# Altium PCB Mega2560_Custom.PcbDoc (part 4 of 5)
Units mil, origin at the board's own origin, x right, y up, seen from the top; angles counter-clockwise.
Board outline 4724.41 x 2992.13 mil, 2 copper layers (Top Layer, Bottom Layer), stack 57 mil thick; 197 components, 130 nets, 758 pads, 836 vias.
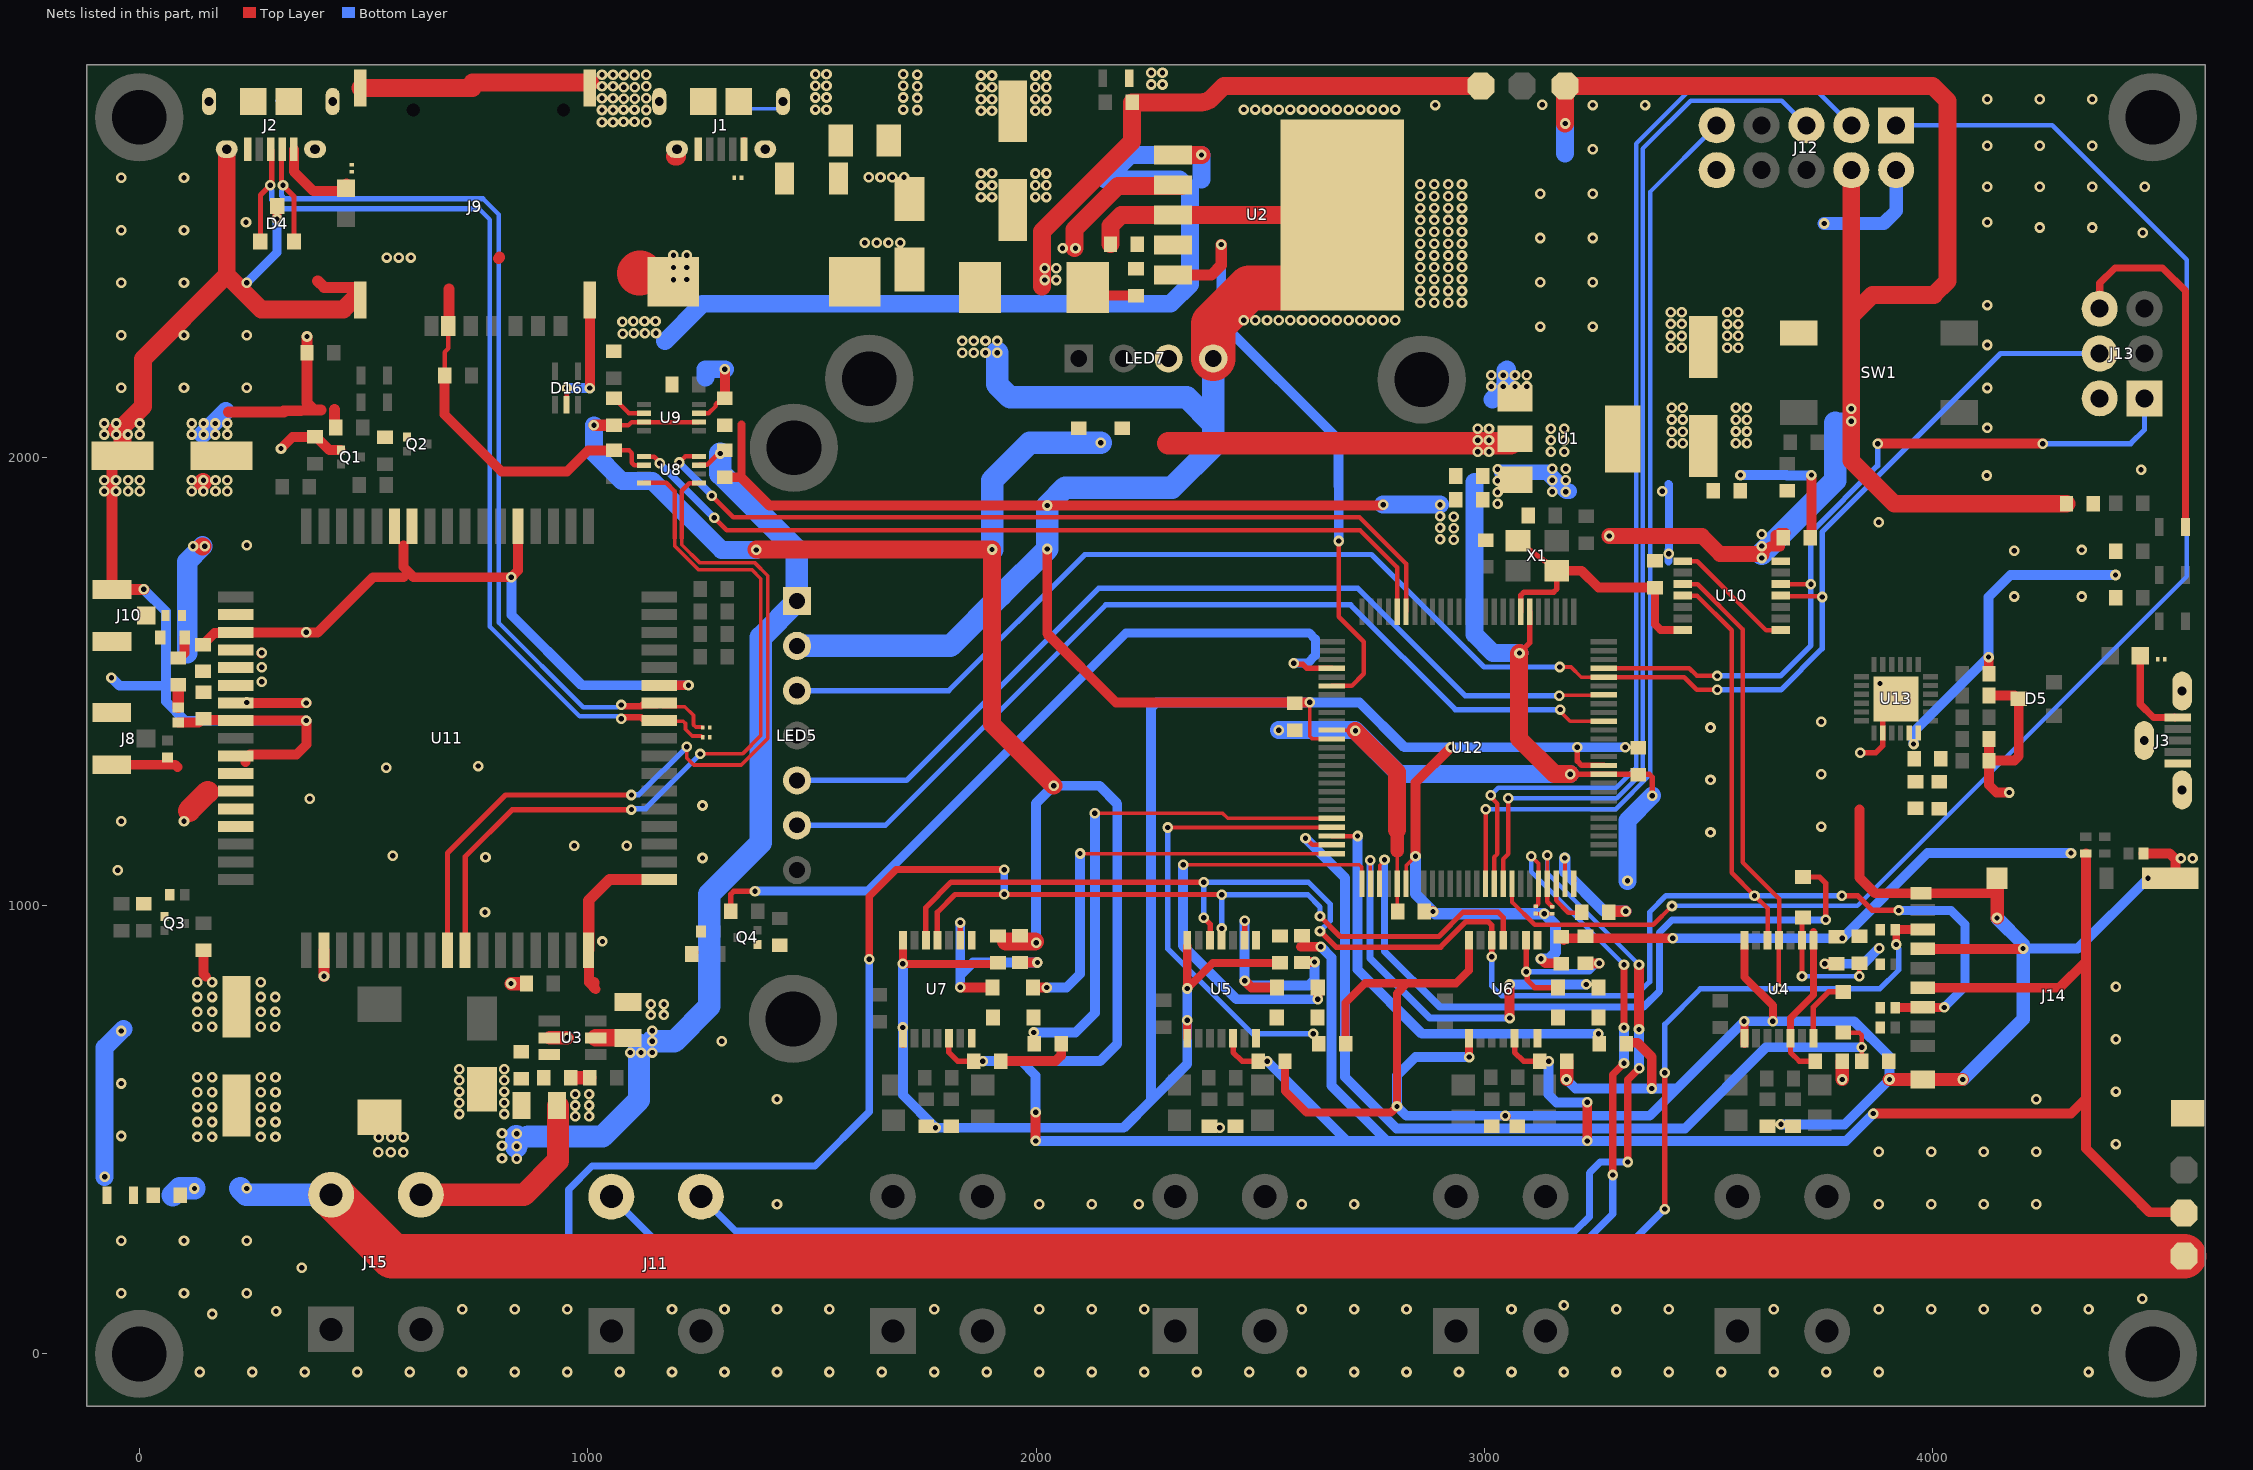
[diagram p2: the nets of this part, all layers, seen from the top]

## Via types
v1: diameter 23.62, hole 11.81, Top Layer to Bottom Layer, 836 vias

## Nets (pads, with @x,y where several pads share a name; then routed paths per layer and width w, separated by ;. In a path a pad name is that pad's centre, name@x,y a point inside that pad or via, vN(x,y) a via of type N, cw(c..) or ccw(c..) an arc to the next point about the centre after c; other vN are vias at no path point) (continued)
GND: (continued)
  other v1: 135.05,-40.23 252.05,-40.23 369.05,-40.23 486.05,-40.23 603.05,-40.23 720.05,-40.23 837.05,-40.23 954.05,-40.23 1071.05,-40.23 1188.05,-40.23 1305.05,-40.23 1422.05,-40.23 1539.05,-40.23 1656.05,-40.23 1773.05,-40.23 1890.05,-40.23 2007.05,-40.23 2124.05,-40.23 2241.05,-40.23 2358.05,-40.23 2475.05,-40.23 2592.05,-40.23 2709.05,-40.23 2826.05,-40.23 2943.05,-40.23 3060.05,-40.23 3177.05,-40.23 3294.05,-40.23 3411.05,-40.23 3528.05,-40.23 3645.05,-40.23 3762.05,-40.23 3879.05,-40.23 4347.05,-40.23 163,89 305,95 720.05,99.77 837.05,99.77 954.05,99.77 1188.05,99.77 1305.05,99.77 1422.05,99.77 1539.05,99.77 1773.05,99.77 2007.05,99.77 2124.05,99.77 2241.05,99.77 2592.05,99.77 2709.05,99.77 2826.05,99.77 3060.05,99.77 3294.05,99.77 3411.05,99.77 3645.05,99.77 3879.05,99.77 3996.05,99.77 4113.05,99.77 4230.05,99.77 4347.05,99.77 3177.05,108.77 4467,123 -40.23,135.05 99.77,135.05 239.77,135.05 362,192 -40.23,252.05 99.77,252.05 239.77,252.05 1422.05,333.77 2007.05,333.77 2124.05,333.77 2229.05,333.77 2592.05,333.77 2709.05,333.77 3879.05,333.77 3996.05,333.77 4113.05,333.77 4230.05,333.77 3879.05,450.77 3996.05,450.77 4113.05,450.77 4230.05,450.77 4408,468 -40.23,486.05 2409.82,504.45 972,530 1003,530 972,554 1003,554 1422.05,567.77 4230.05,567.77 972,579 1003,579 4408,585 -40.23,603.05 1299,697 4408,702 129.35,729.42 162.35,729.42 270.82,729.42 303.35,729.42 1141,756 1170,756 129.35,762.67 162.35,762.67 270.82,762.67 303.35,762.67 1141,780 1170,780 129.35,795.92 162.35,795.92 270.82,795.92 303.35,795.92 4408,819 129.35,829.17 162.35,829.17 270.82,829.17 412,842 1032.82,919.95 771,985 -47.81,1078.64 4553,1105 4579,1105 1256,1106 772.02,1107.88 565,1111 970,1133 1087,1133 3504,1163 3751,1176 -40.23,1188.05 99.77,1188.05 1256,1223 380,1238 3504,1280 3751,1293 551,1307 756,1311 3504,1397 3751,1410 239.77,1452.72 3882,1495 4181,1689 4332,1689 4181,1791 4332,1793 239.77,1803.72 2931,1815.67 2900.82,1816.95 2931,1841.33 2900.82,1842.62 3879.05,1854.77 2931,1867 2900.82,1868.28 -78,1924 -52,1924 -25,1924 1,1924 -78,1948.6 -52,1948.6 -25,1948.6 1,1948.6 4120,1959 3729,1959.95 4464.05,1971.77 3560.58,2030.82 3585.18,2030.82 -78,2050.4 -51.67,2050.4 -25.33,2050.4 1,2050.4 3560.58,2057.15 3585.18,2057.15 4121,2065 -78,2075 -51.67,2075 1,2075 3560.58,2083.48 3585.18,2083.48 3560.58,2109.82 3585.18,2109.82 4121,2154 -40.23,2154.72 99.77,2154.72 239.77,2154.72 3015.18,2157.58 3041.52,2157.58 3067.85,2157.58 3094.18,2157.58 3015.18,2182.18 3041.52,2182.18 3067.85,2182.18 3094.18,2182.18 1835,2233 1861,2233 1887,2233 3415,2244 3439.6,2244 3541.4,2244 3566,2244 4121,2250 1835,2259 1861,2259 1887,2259 1913,2259 3415,2270 3439.6,2270 3541.4,2270.33 3566,2270.33 -40.23,2271.72 99.77,2271.72 239.77,2271.72 3124,2291 3241,2291 3415,2297 3439.6,2297 3541.4,2296.67 3566,2296.67 2462.82,2304.95 2488.82,2304.95 2514.82,2304.95 2540.82,2304.95 2566.82,2304.95 2592.82,2304.95 2618.82,2304.95 2644.82,2304.95 2670.82,2304.95 2696.82,2304.95 2722.82,2304.95 2748.82,2304.95 2774.82,2304.95 2800.82,2304.95 3415,2323 3439.6,2323 3541.4,2323 3566,2323 4121,2339 2856.82,2343.95 2887.82,2343.95 2918.82,2343.95 2949.82,2343.95 2856.82,2370.37 2887.82,2370.37 2918.82,2370.37 2949.82,2370.37 -40.23,2388.72 99.77,2388.72 3124,2389.8 3241,2389.8 2856.82,2396.78 2887.82,2396.78 2918.82,2396.78 2949.82,2396.78 2856.82,2423.2 2887.82,2423.2 2918.82,2423.2 2949.82,2423.2 2856.82,2449.62 2887.82,2449.62 2918.82,2449.62 2949.82,2449.62 2856.82,2476.04 2887.82,2476.04 2918.82,2476.04 2949.82,2476.04 3124,2488.6 3241,2488.6 4468,2500 2856.82,2502.46 2887.82,2502.46 2918.82,2502.46 2949.82,2502.46 -40.23,2505.72 99.77,2505.72 4238,2512 4355,2512 238,2524 4121,2524 2856.82,2528.88 2887.82,2528.88 2918.82,2528.88 2949.82,2528.88 2856.82,2555.29 2887.82,2555.29 2918.82,2555.29 2949.82,2555.29 2856.82,2581.71 2887.82,2581.71 2918.82,2581.71 2949.82,2581.71 3124,2587.4 3241,2587.4 4121,2603 4238,2603 4355,2603 4472,2603 2856.82,2608.13 2887.82,2608.13 2918.82,2608.13 2949.82,2608.13 -40.23,2622.72 99.77,2622.72 1626.53,2624.05 1652.87,2624.05 1679.2,2624.05 1705.53,2624.05 3241,2686.2 4121,2694 4238,2694 4355,2694 1031.82,2746.95 1056.42,2746.95 1130.22,2746.95 1079.82,2747.95 1104.42,2747.95 1877,2772 1901.6,2772 1998.4,2772 2023,2772 1031.82,2773.95 1056.42,2773.95 1130.22,2773.95 1735,2774 1079.82,2774.95 1104.42,2774.95 1507.82,2774.95 1532.42,2774.95 1704,2775 2462.82,2774.95 2488.82,2774.95 2514.82,2774.95 2540.82,2774.95 2566.82,2774.95 2592.82,2774.95 2618.82,2774.95 2644.82,2774.95 2670.82,2774.95 2696.82,2774.95 2722.82,2774.95 2748.82,2774.95 2774.82,2774.95 2800.82,2774.95 2890,2785 3241,2785 3358,2785 3129,2786 1877,2798 1901.6,2798 1998.4,2798.33 2023,2798.33 4121,2798 4238,2798 4355,2798 1080.4,2799 1105,2799 1031.82,2799.95 1056.42,2799.95 1130.22,2799.95 1735,2801 1507.82,2801.95 1532.42,2801.95 1704,2802 1080.4,2825 1105,2825 1877,2825 1901.6,2825 1998.4,2824.67 2023,2824.67 1031.82,2826.95 1056.42,2826.95 1130.22,2826.95 1735,2827 1507.82,2827.95 1532.42,2827.95 1704,2828 2256.82,2830.95 2281.82,2830.95 1877,2851 1901.6,2851 1998.4,2851 2023,2851 1080.4,2852 1105,2852 1031.82,2852.95 1056.42,2852.95 1130.22,2852.95 1735,2853 1507.82,2853.95 1532.42,2853.95 1704,2854 2256.82,2856.95 2281.82,2856.95
GNSS_ANT: C39.2 J10.1 L3.2
GSM_FB: R1.1 R2.1 U2.4
GSM_PWR: C8.1 C36.1 C37.1 C38.1 D21.1 L2.2 P4.1 R1.2 R7.2 R20.2 R25.2 R26.2 U11.55 U11.56 U11.57 | length 2335.2
  Top Layer w22: v1@272.82,1561.95 v1(272.82,1563.95) ; C8.1@2141.82,2359.95 R1.2@2222.82,2359.95
  Top Layer w25: D21.1@87,1441.46 R20.2@87,1492 ; 199,2100.5 322,2100.5 ; 321.95,2103.1 405.14,2104.86 389.64,2104.86 374,2120.5 R25.2@374,2233 v1(374,2269) ; 435.5,2105.5 435.5,2068.5 R26.2@438,2066 ; 800.82,2442.95 803.32,2445.45
  Top Layer w40: v1@140.82,1801.18 v1@141,1801 ; v1@141,1943 v1@142,1944 ; C36.1@194.82,1998.82 C36.1@196.82,1996.82 ; 2012.82,2379.95 2012.82,2502.82 2214,2704 R7.2@2214,2791 2368.42,2791 ccw(c2368.34,2823.97) 2391.63,2800.63 2418.95,2827.95 P4.1@2991.82,2827.95
  Top Layer w100: 1115.26,2409.95 1116.26,2410.95
  Bottom Layer w25: 101.82,1551.95 107.82,1557.95 107.82,1696
  Bottom Layer w40: v1@140.82,2050.95 192.87,2103
  Bottom Layer w45: 107,1562 107,1767 v1@141,1801
  other v1: 272.82,1498.95 272.82,1531.45 120,1801 146,1801 117,1924 143,1924 170,1924 196,1924 117,1948.6 143,1948.6 170,1948.6 196,1948.6 117,2050.4 143.33,2050.4 169.67,2050.4 196,2050.4 117,2075 143.33,2075 169.67,2075 196,2075 1191.18,2395.32 2019,2395 2045,2395 1221,2395.95 2019,2421 2045,2421 1191.18,2422.63 1221,2422.95 551.82,2444.95 578.82,2444.95 605.82,2444.95 1191.18,2449.95 1221,2449.95
GSM_PWR_EN: U2.5 U12.56 | length 1333.7
  Top Layer w10: U12.56@2659.67,1489.59 2703.59,1489.59 2730.82,1516.82 2730.82,1587.95 2674.82,1643.95 v1(2674.82,1812.95)
  Top Layer w25: U2.5@2305.07,2406.09 2390.96,2406.09 2412.82,2427.95 v1(2412.82,2473.95)
  Bottom Layer w22: v1(2412.82,2473.95) 2412.82,2300.18 2674,2039 2674,1935 ; v1(2674.82,1812.95) 2674.82,1935
GSM_RESET: R33.2 U12.54 | length 1764.9
  Top Layer w12: R33.2@1319,992 1319,1024.97 1326.03,1032 v1(1373,1032) ; v1(2574.82,1539.95) 2577.05,1537.72 2595.05,1537.72 2603.81,1528.96 U12.54@2659.67,1528.96
  Bottom Layer w20: v1(1373,1032) 1624.91,1032 2200.86,1607.95 2608.82,1607.95 2622.82,1593.95 2622.82,1558.04 2605.42,1540.64 2575.52,1540.64 v1(2574.82,1539.95)
GSM_RX: U8.4 U11.10 | length 1751.8
  Top Layer w8: 1194.39,1819 1194.39,1801.61 1247.61,1748.39 1366.61,1748.39 1386,1729 1386,1379 1345,1338 v1(1251,1338)
  Top Layer w10: U8.4@1125.8,1942.42 1175.35,1942.42 1194.39,1923.38 1194.39,1819
  Top Layer w12: U11.10@726.63,900.55 726.63,1108.76 831.82,1213.95 v1(1097.45,1213.95) v1@1099.82,1213.95
  Bottom Layer w12: v1(1097.45,1213.95) 1099.68,1216.17 1129.17,1216.17 v1(1251,1338)
GSM_TX: U8.5 U11.9 | length 1833.8
  Top Layer w8: 1210,1819 1210,1804.38 1250.38,1764 1373.08,1764 1401.61,1735.47 1401.61,1372.53 1342.47,1313.39 1236.61,1313.39 1221.11,1328.89 v1(1221.11,1353.98)
  Top Layer w10: 1210,1819 1210,1925.13 1226.39,1941.52 1246.94,1941.52 U8.5@1247.85,1942.42
  Top Layer w12: U11.9@687.26,900.55 687.26,1117.07 816.67,1246.48 v1(1097.45,1246.48)
  Bottom Layer w12: v1(1097.45,1246.48) 1098.11,1247.13 1114.27,1247.13 v1(1221.11,1353.98)
GSM_USB.GSM_USB_D_N: D4.2 D17.1 J2.2 U11.28 | length 2228.2
  Top Layer w8: U11.28@1159.7,1451.73 1167.91,1443.52 1216.48,1443.52 1236,1424 1236,1402.69 1240.69,1398 1252.16,1398 1252.43,1397.72 D17.1@1256.19,1397.72
  Top Layer w12: J2.2@319.04,2686.65 317.25,2684.85 317.25,2614 318.34,2612.91 318.34,2608.22 345,2581.56 D4.2@345,2481
  Top Layer w15: v1(1074.82,1447.35) 1076.47,1445.7 1082.57,1445.7 1083.73,1444.54 1119.05,1444.54 1121.53,1447.02 1155,1447.02 U11.28@1159.7,1451.73
  Bottom Layer w10: 766.58,2576.16 801.74,2541 ; 802,2541 802,1630.06 990.01,1442.04 1065.83,1442.04 1071.14,1447.35 v1(1074.82,1447.35)
  Bottom Layer w12: v1(320.56,2606) 318.34,2603.78 318.34,2595.56 317.25,2594.47 317.25,2583.19 324.28,2576.16 766.58,2576.16
GSM_USB.GSM_USB_D_P: D4.1 D18.1 J2.3 U11.27 | length 2252.9
  Top Layer w8: U11.27@1159.7,1412.36 1161.38,1410.69 1213.31,1410.69 1218,1406 1218,1393.23 1233.23,1378 1253.46,1378 1255.46,1376 D18.1@1256.25,1376
  Top Layer w12: D4.1@270.2,2481 270.2,2584.26 294.16,2608.22 294.16,2612.91 295.25,2614 295.25,2684.85 J2.3@293.45,2686.65
  Top Layer w15: v1(1074.82,1416.73) 1076.47,1418.38 1082.57,1418.38 1083.73,1419.54 1119.05,1419.54 1121.53,1417.06 1155,1417.06 U11.27@1159.7,1412.36
  Bottom Layer w8: v1(1074.82,1416.73) v1@1077.81,1419.72
  Bottom Layer w10: 757.47,2554.16 782,2529.63 ; 782,2529.37 782,1621.77 981.73,1422.04 1065.83,1422.04 1071.14,1416.73 v1(1074.82,1416.73)
  Bottom Layer w12: v1(291.94,2606) 294.16,2603.78 294.16,2595.56 295.25,2594.47 295.25,2574.08 315.16,2554.16 757.47,2554.16
JTAG_TCK: J12.1 U12.93 | length 3366.7
  Top Layer w10: U12.93@3061.25,1048.65 3061.25,1007.75 3112,957 3376,957 v1(3418,999)
  Bottom Layer w10: v1(3418,999) 3831,999 4565.82,1733.82 4565.82,2439.95 4265.82,2739.95 J12.1@3917.82,2739.95
JTAG_TDI: J12.9 U12.90 | length 2074.4
  Top Layer w10: U12.90@3002.19,1048.65 3002.51,1048.96 v1@3002.51,1214.95
  Bottom Layer w10: v1(3002.82,1214.95) 3292.43,1214.95 3370,1292.52 3370,2592.13 J12.9@3517.82,2739.95
JTAG_TDO: J12.3 U12.91 | length 2507.6
  Top Layer w10: v1(3013.82,1245.95) 3013.82,1242.26 3028.82,1227.26 3028.82,1114.95 3021.88,1108 U12.91@3021.88,1048.65
  Bottom Layer w10: v1(3013.82,1245.95) 3030.82,1262.95 3293.82,1262.95 3338,1307.13 3338,2699.13 3454.82,2815.95 3741.82,2815.95 J12.3@3817.82,2739.95
JTAG_TMS: J12.5 U12.92 | length 2342.1
  Top Layer w10: U12.92@3041.56,1048.65 3041.56,1103.69 3052.82,1114.95 v1(3052.82,1238.95)
  Bottom Layer w10: v1(3052.82,1238.95) 3294.82,1238.95 3353,1297.13 3353,2688.13 3459.82,2794.95 3662.82,2794.95 J12.5@3717.82,2739.95
MCU_RX: U8.8 U12.45 | length 1870.5
  Top Layer w10: v1(1203.82,1988) 1217.3,2001.48 U8.8@1247.85,2001.48 ; v1(1276.82,1913.95) 1324.82,1865.95 2721.14,1865.95 2825.03,1762.07 U12.45@2825.03,1654.95
  Bottom Layer w16: v1(1203.82,1988) v1@1276.42,1915.41
MCU_TX: U8.1 U12.46 | length 1882.4
  Top Layer w10: U8.1@1125.8,2001.48 1126.31,2000.96 1148.15,2000.96 1160.82,1988.3 v1(1160.82,1985.95) ; v1(1282.32,1864.45) 1309.82,1836.95 2722.31,1836.95 2805.34,1753.91 U12.46@2805.34,1654.95
  Bottom Layer w16: v1(1160.82,1985.95) v1(1282.32,1864.45)
MISO: J13.1 U10.12 U12.22 | length 1753.6
  Top Layer w10: U12.22@3265.97,1528.96 3456.81,1528.96 3472.9,1512.87 3517.9,1512.87 v1(3518.82,1511.95) ; U10.12@3660.07,1716.54 v1(3727.82,1716.54)
  Top Layer w22: v1@3877.57,2030.26 v1@4244.82,2030.26
  Bottom Layer w12: v1(3518.82,1511.95) 3659.82,1511.95 3727.82,1579.95 v1(3727.82,1716.54) 3727.82,1831.82 3876.82,1980.82 v1(3876.82,2029.95) ; v1(4244.82,2029.95) 4440.77,2029.95 4471.82,2061 J13.1@4471.82,2130.95
MISO_3.3V: D28.1 J14.7 U4.11 U5.11 U6.11 U7.11 U10.3 | length 7982.7
  Top Layer w10: U10.3@3441.57,1716.54 3475.23,1716.54 3575.41,1616.36 3575.41,1096.59 3656.68,1015.32 U4.11@3656.68,922.41 3655.84,921.57 3655.84,814.84 v1(3655,814)
  Top Layer w12: U7.11@1779.64,909.41 U7.11@1779.64,922.41 1779.64,984.96 1819.22,1024.54 v1@2413.82,1024.54 ; U5.11@2413.82,909.41 U5.11@2413.82,922.41 v1(2413.82,948.95) ; v1(2633,976) 2678,931 2898,931 2952,985 3030,985 3041.68,973.32 U6.11@3041.68,922.41 U6.11@3041.68,909.41 ; v1(3402,323) v1(3402,627)
  Top Layer w16: v1(1627.82,879.95) 1627.82,1019.95 1687.82,1079.95 v1(1928.82,1079.95) ; D28.1@3917.03,946.29 3916.73,946 3918,944.73 v1(3918,913) ; J14.7@3977.22,946.29 J14.7@3977.52,946.59
  Top Layer w20: D28.1@3917.03,946.29 J14.7@3977.22,946.29
  Bottom Layer w12: v1(2413.82,948.95) v1(2413.82,1023.95) 2605.82,1023.95 2633,996.77 v1(2633,976) ; v1(3402,627) 3402,735 3481,814 v1(3655,814) 3881.23,814 3924,856.77 3924,903.86 3918,909.86 v1(3918,913)
  Bottom Layer w16: v1(1627.82,879.95) 1627.82,729.92 1627.82,539.95 1506.82,418.95 1009.82,418.95 957.82,366.95 957.82,244.89 983.76,218.95 3297.95,218.95 v1(3402,323) ; v1(1928.82,1024.95) v1(1928.82,1079.95)
MOSI: J13.4 LED5.3 U10.11 U12.21 | length 3715.8
  Top Layer w8: v1(3167.82,1531.95) 3192.82,1531.95 3215.49,1509.28 U12.21@3265.97,1509.28
  Top Layer w10: U12.21@3265.97,1509.28 3445.17,1509.28 3473.5,1480.95 v1(3518.82,1480.95) ; U10.11@3660.07,1690.95 3661.57,1689.45 3753.32,1689.45 v1@3754.82,1687.95
  Bottom Layer w12: LED5.3@1465.82,1482.95 LED5.3@1466.82,1482.95 ; LED5.3@1466.82,1478.95 1804.82,1478.95 2108.71,1782.84 2747.9,1782.84 2998.79,1531.95 v1(3167.82,1531.95) ; v1(3518.82,1480.95) 3660.82,1480.95 3752.82,1572.95 3752.82,1832.78 4150.99,2230.95 J13.4@4371.82,2230.95
  other v1: 3752.82,1687.95
MOSI_3.3V: D26.1 J14.3 U4.12 U5.12 U6.12 U7.12 U10.4 | length 4274
  Top Layer w10: U10.4@3441.57,1690.95 3473.82,1690.95 3551,1613.77 3551,1073 v1(3602,1022) 3602.77,1022 3631.09,993.68 U4.12@3631.09,922.41 U4.12@3631.09,909.41
  Top Layer w12: U7.12@1754.05,909.41 U7.12@1754.05,922.41 1754.05,995.56 1810.44,1051.95 v1(2373.82,1051.95) ; v1(2373.82,972.95) 2388.23,958.54 U5.12@2388.23,922.41 U5.12@2388.23,909.41 ; v1(2633,943) 2669,907 2902,907 2959,964 3008,964 3015.74,956.26 3015.74,909.77 3016.09,909.41 v1(3016.09,885.54) ; v1(3797,1022) 3832,1022 3865,989 v1@3917,989 ; D26.1@3916.73,772 D26.1@3917.41,772.68 ; J14.3@3973.66,772.68 J14.3@3975.92,774.95
  Top Layer w20: D26.1@3917.41,772.68 3973.66,772.68 v1@4024.96,772.68
  Top Layer w22: J14.3@3975.92,774.95 J14.3@3977.52,773.36
  Bottom Layer w12: v1(2373.82,972.95) v1(2373.82,1051.95) 2606.82,1051.95 2656,1002.77 2656,966 v1(2633,943) ; v1(3016.09,885.54) 3016.09,820.91 3038,799 3337,799 3368,830 3368,985 3405,1022 v1(3602,1022) v1(3797,1022)
  Bottom Layer w20: v1(3924,989) 4040,989 4071,958 4071,818.69 v1(4024.97,772.67)
NetC39_1: C39.1 U11.53
NetD1_1: D1.1 F1.1 J1.1 | length 37.4
  Top Layer w12: J1.1@1348.63,2670.65 1348.73,2670.74 1348.73,2707.85 J1.1@1348.82,2707.95
NetD2_1: D2.1 F2.1 J2.1 | length 191
  Top Layer w22: J2.1@344.63,2686.65 344.63,2636.37 388,2593 F2.1@446,2593
  Top Layer w25: F2.1@451.5,2592 459.75,2600.25 462,2602.5 F2.1@462,2609
NetD3_1: D3.1 F3.1 J3.1 | length 200.6
  Top Layer w16: F3.1@4462.29,1556.95 4462.29,1448.71 4492.03,1418.97 4539.53,1418.97 4540,1418.5 J3.1@4538.5,1420
NetD7_1: D7.1 L2.1 U2.2 | length 320.4
  Top Layer w40: v1@2085.82,2465.95 2085.82,2507.95 2182.87,2605 U2.2@2324,2605
  other v1: 2059,2465.95 2087.82,2465.95 1618,2478 1644.33,2478 1670.67,2478 1697,2478
NetD8_2: D8.2 R8.1 U4.9 | length 288.1
  Top Layer w10: v1(3836,842) R8.1@3836,871
  Top Layer w12: v1(3707.87,842) U4.9@3707.87,922.41 D8.2@3707.87,973
  Bottom Layer w10: v1(3707.87,842) v1(3836,842)
NetD9_2: D9.2 R9.1 U5.9 | length 489.8
  Top Layer w12: U5.9@2465,922.41 v1(2465,966)
  Top Layer w22: v1(2465,832) 2465.44,832 2480.44,817 D9.2@2537.45,817 ; R9.1@2593,872.95 2594.05,874 v1(2621,874)
  Bottom Layer w22: v1@2464.25,832 2465.44,832 2475.44,822 2607.8,822 2620.69,834.89 2620.69,873.69 v1(2621,874) ; v1(2465,832) v1(2465,966)
NetD10_2: D10.2 U4.7 | length 150.1
  Top Layer w12: U4.7@3733.46,703.91 3733.46,773.46 3767.28,807.28 D10.2@3800,807.28
NetD11_2: D11.2 U5.7 | length 28.1
  Top Layer w12: U5.7@2490.59,690.91 U5.7@2490.59,703.91 U5.7@2490.59,719
NetD12_2: D12.2 R14.1 U6.9 | length 354
  Top Layer w12: U6.9@3092.87,909.41 3092.93,909.34 3092.93,852.07 3095.22,849.78 3095.22,833.78 3112,817 D12.2@3163.72,817
  Top Layer w22: R14.1@3225,870.95 3225.05,871 v1(3256,871)
  Bottom Layer w12: v1(3093,852) 3233.86,852 3252.86,871 v1(3256,871)
NetD13_2: D13.2 R15.1 U7.9 | length 491.4
  Top Layer w12: U7.9@1830.82,909.41 U7.9@1830.82,922.41 v1(1830.82,961.95)
  Top Layer w22: v1(1830.82,817.82) 1831.13,817.51 1901.94,817.51 D13.2@1902.45,817 ; R15.1@1964,872.95 v1(2002.95,872.95)
  Bottom Layer w22: v1(1830.82,817.82) 1830.82,844.82 ; v1(1830.82,961.95) 1830.82,844.82 ; v1(2002.95,872.95) 1858.95,872.95 1830.82,844.82
NetD14_2: D14.2 U6.7 | length 21.1
  Top Layer w12: U6.7@3118.46,690.91 U6.7@3118.46,703.91 U6.7@3118.46,712
NetD15_2: D15.2 U7.7
NetF1_2: F1.2 FB1.1
NetJ13_2: J13.2 SB1.1
NetL3_1: L3.1 R20.1 | length 53.5
  Top Layer w22: R20.1@87,1552 89.5,1552 100.75,1563.25 100.75,1597.19 L3.1@101.56,1598
NetLED1_1: LED1.1 R6.1